# Altium PCB ledcube_v2.PcbDoc (part 1 of 18)
Units mil, origin at the board's own origin, x right, y up, seen from the top; angles counter-clockwise.
Board outline 3130 x 3300 mil, 2 copper layers (Top Layer, Bottom Layer); 188 components, 216 nets, 29515 pads, 250 vias.
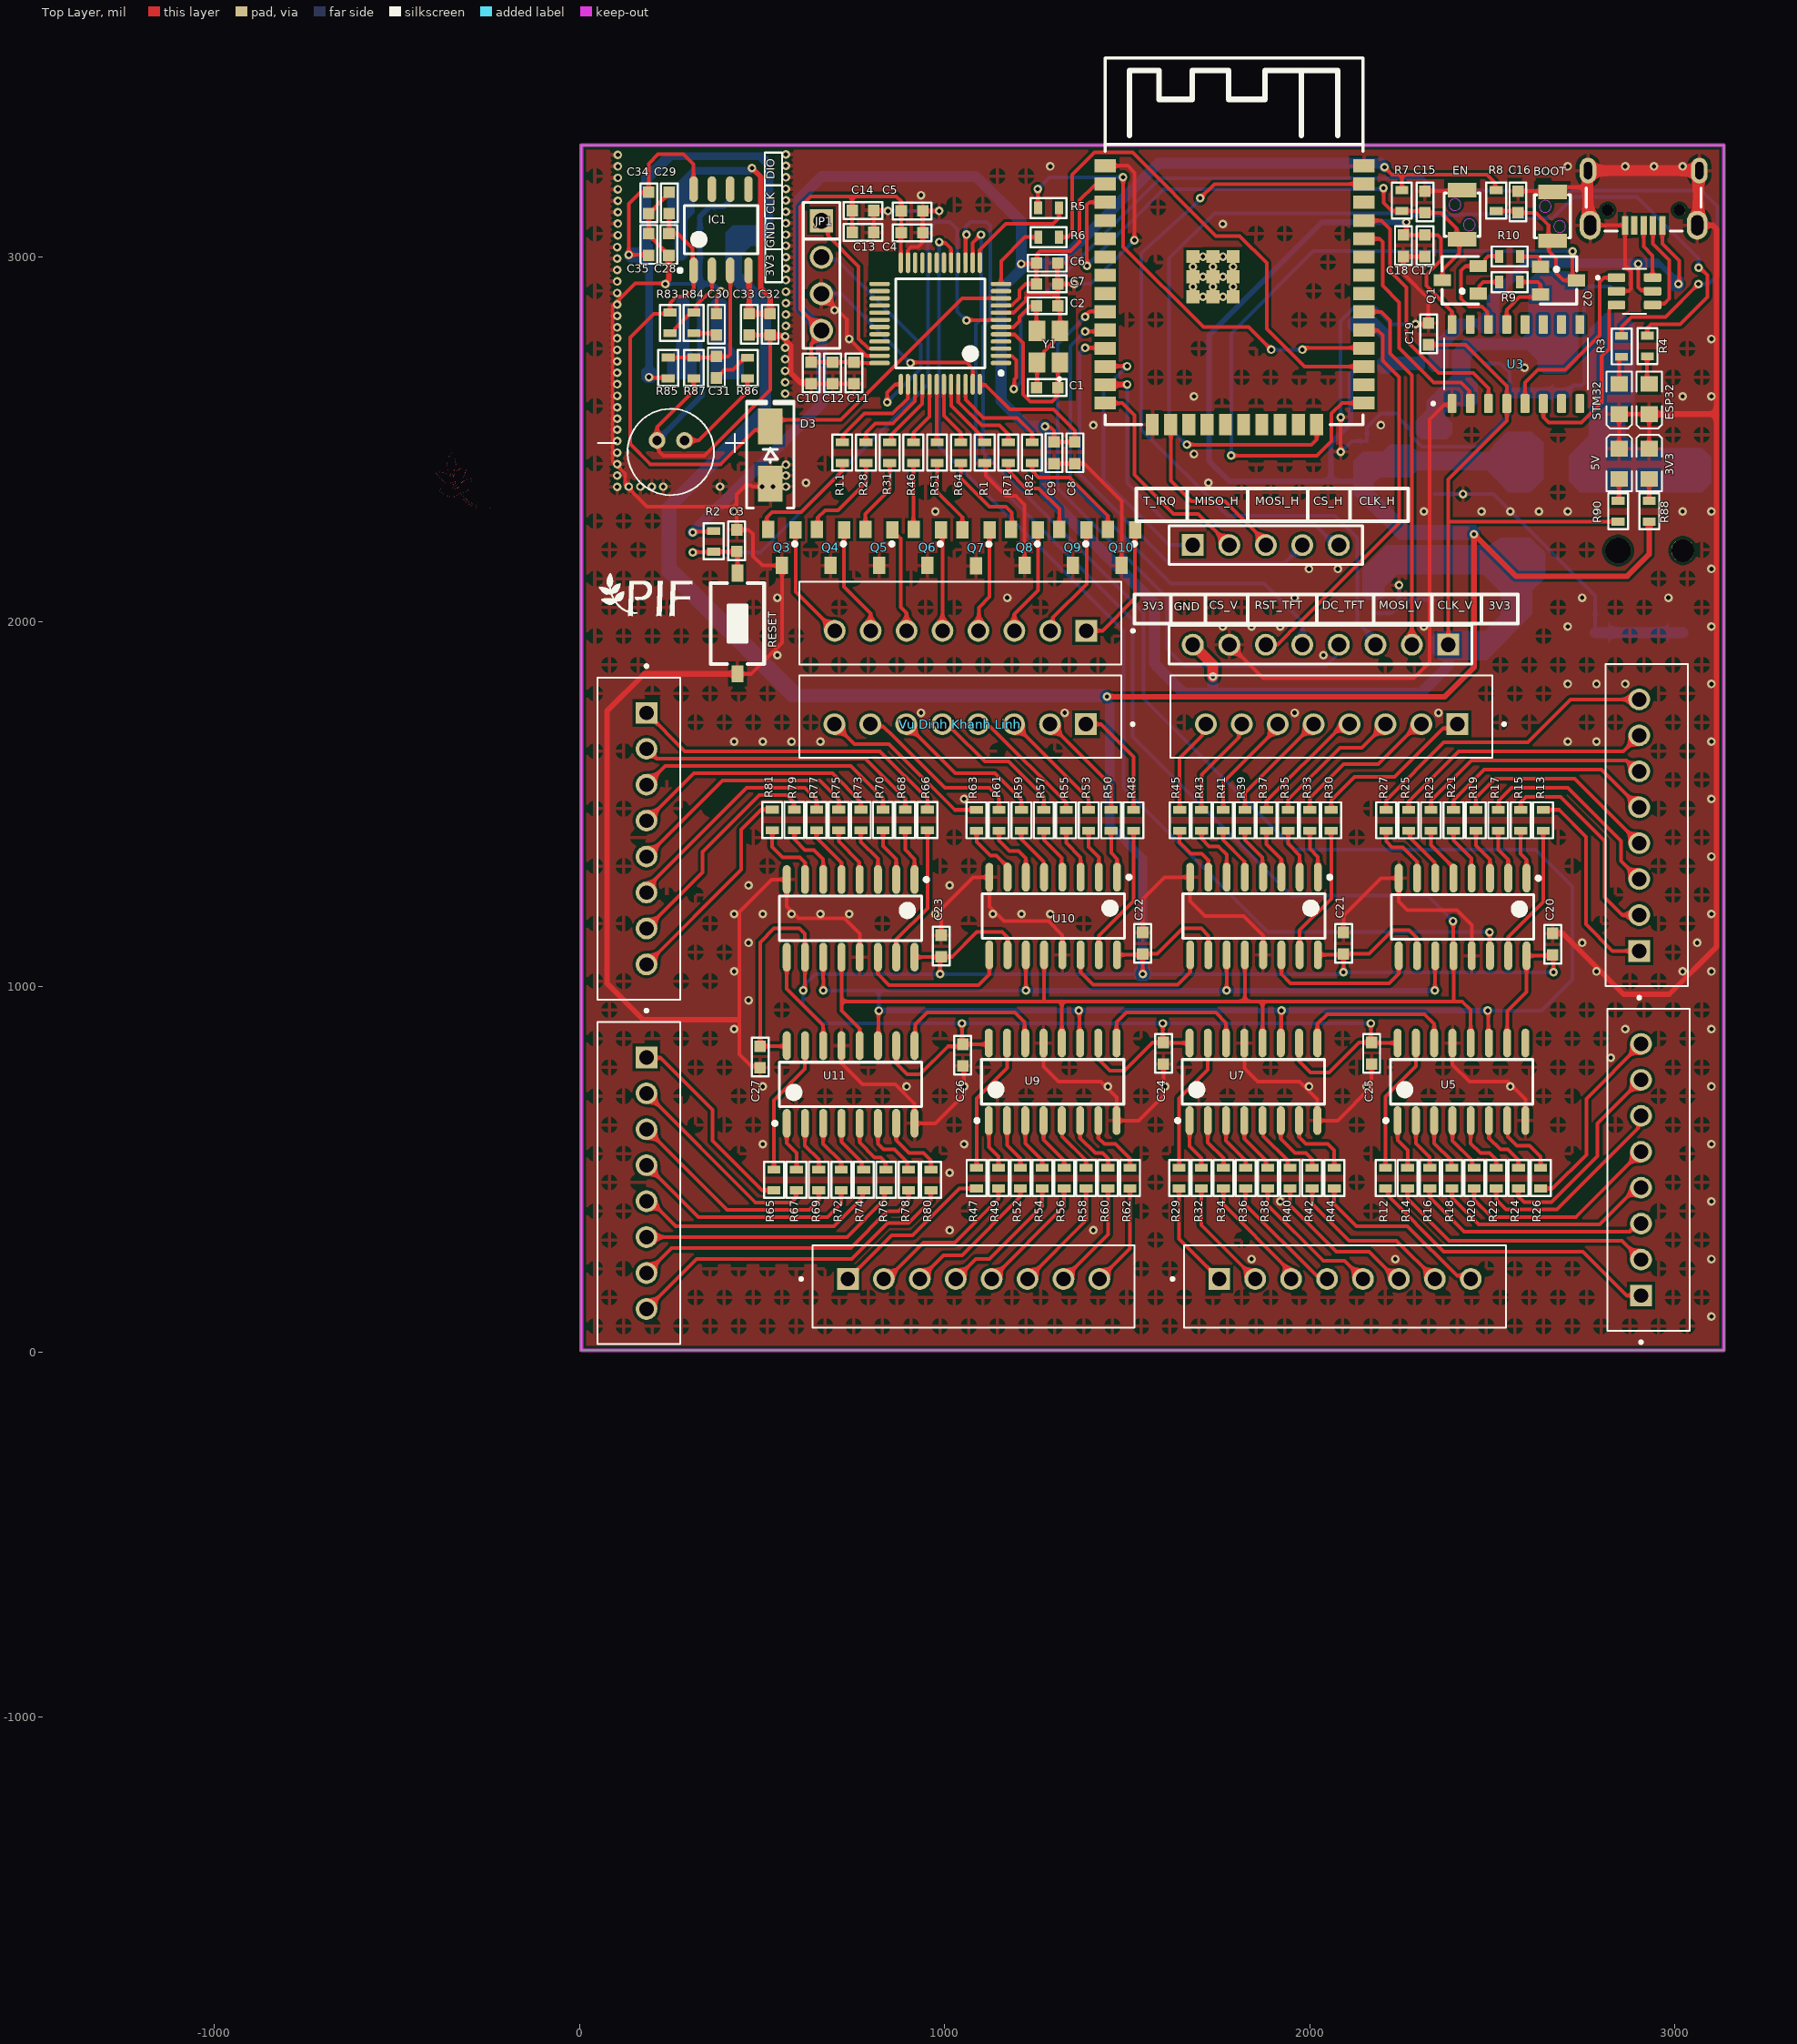
[diagram p0: Top Layer view]
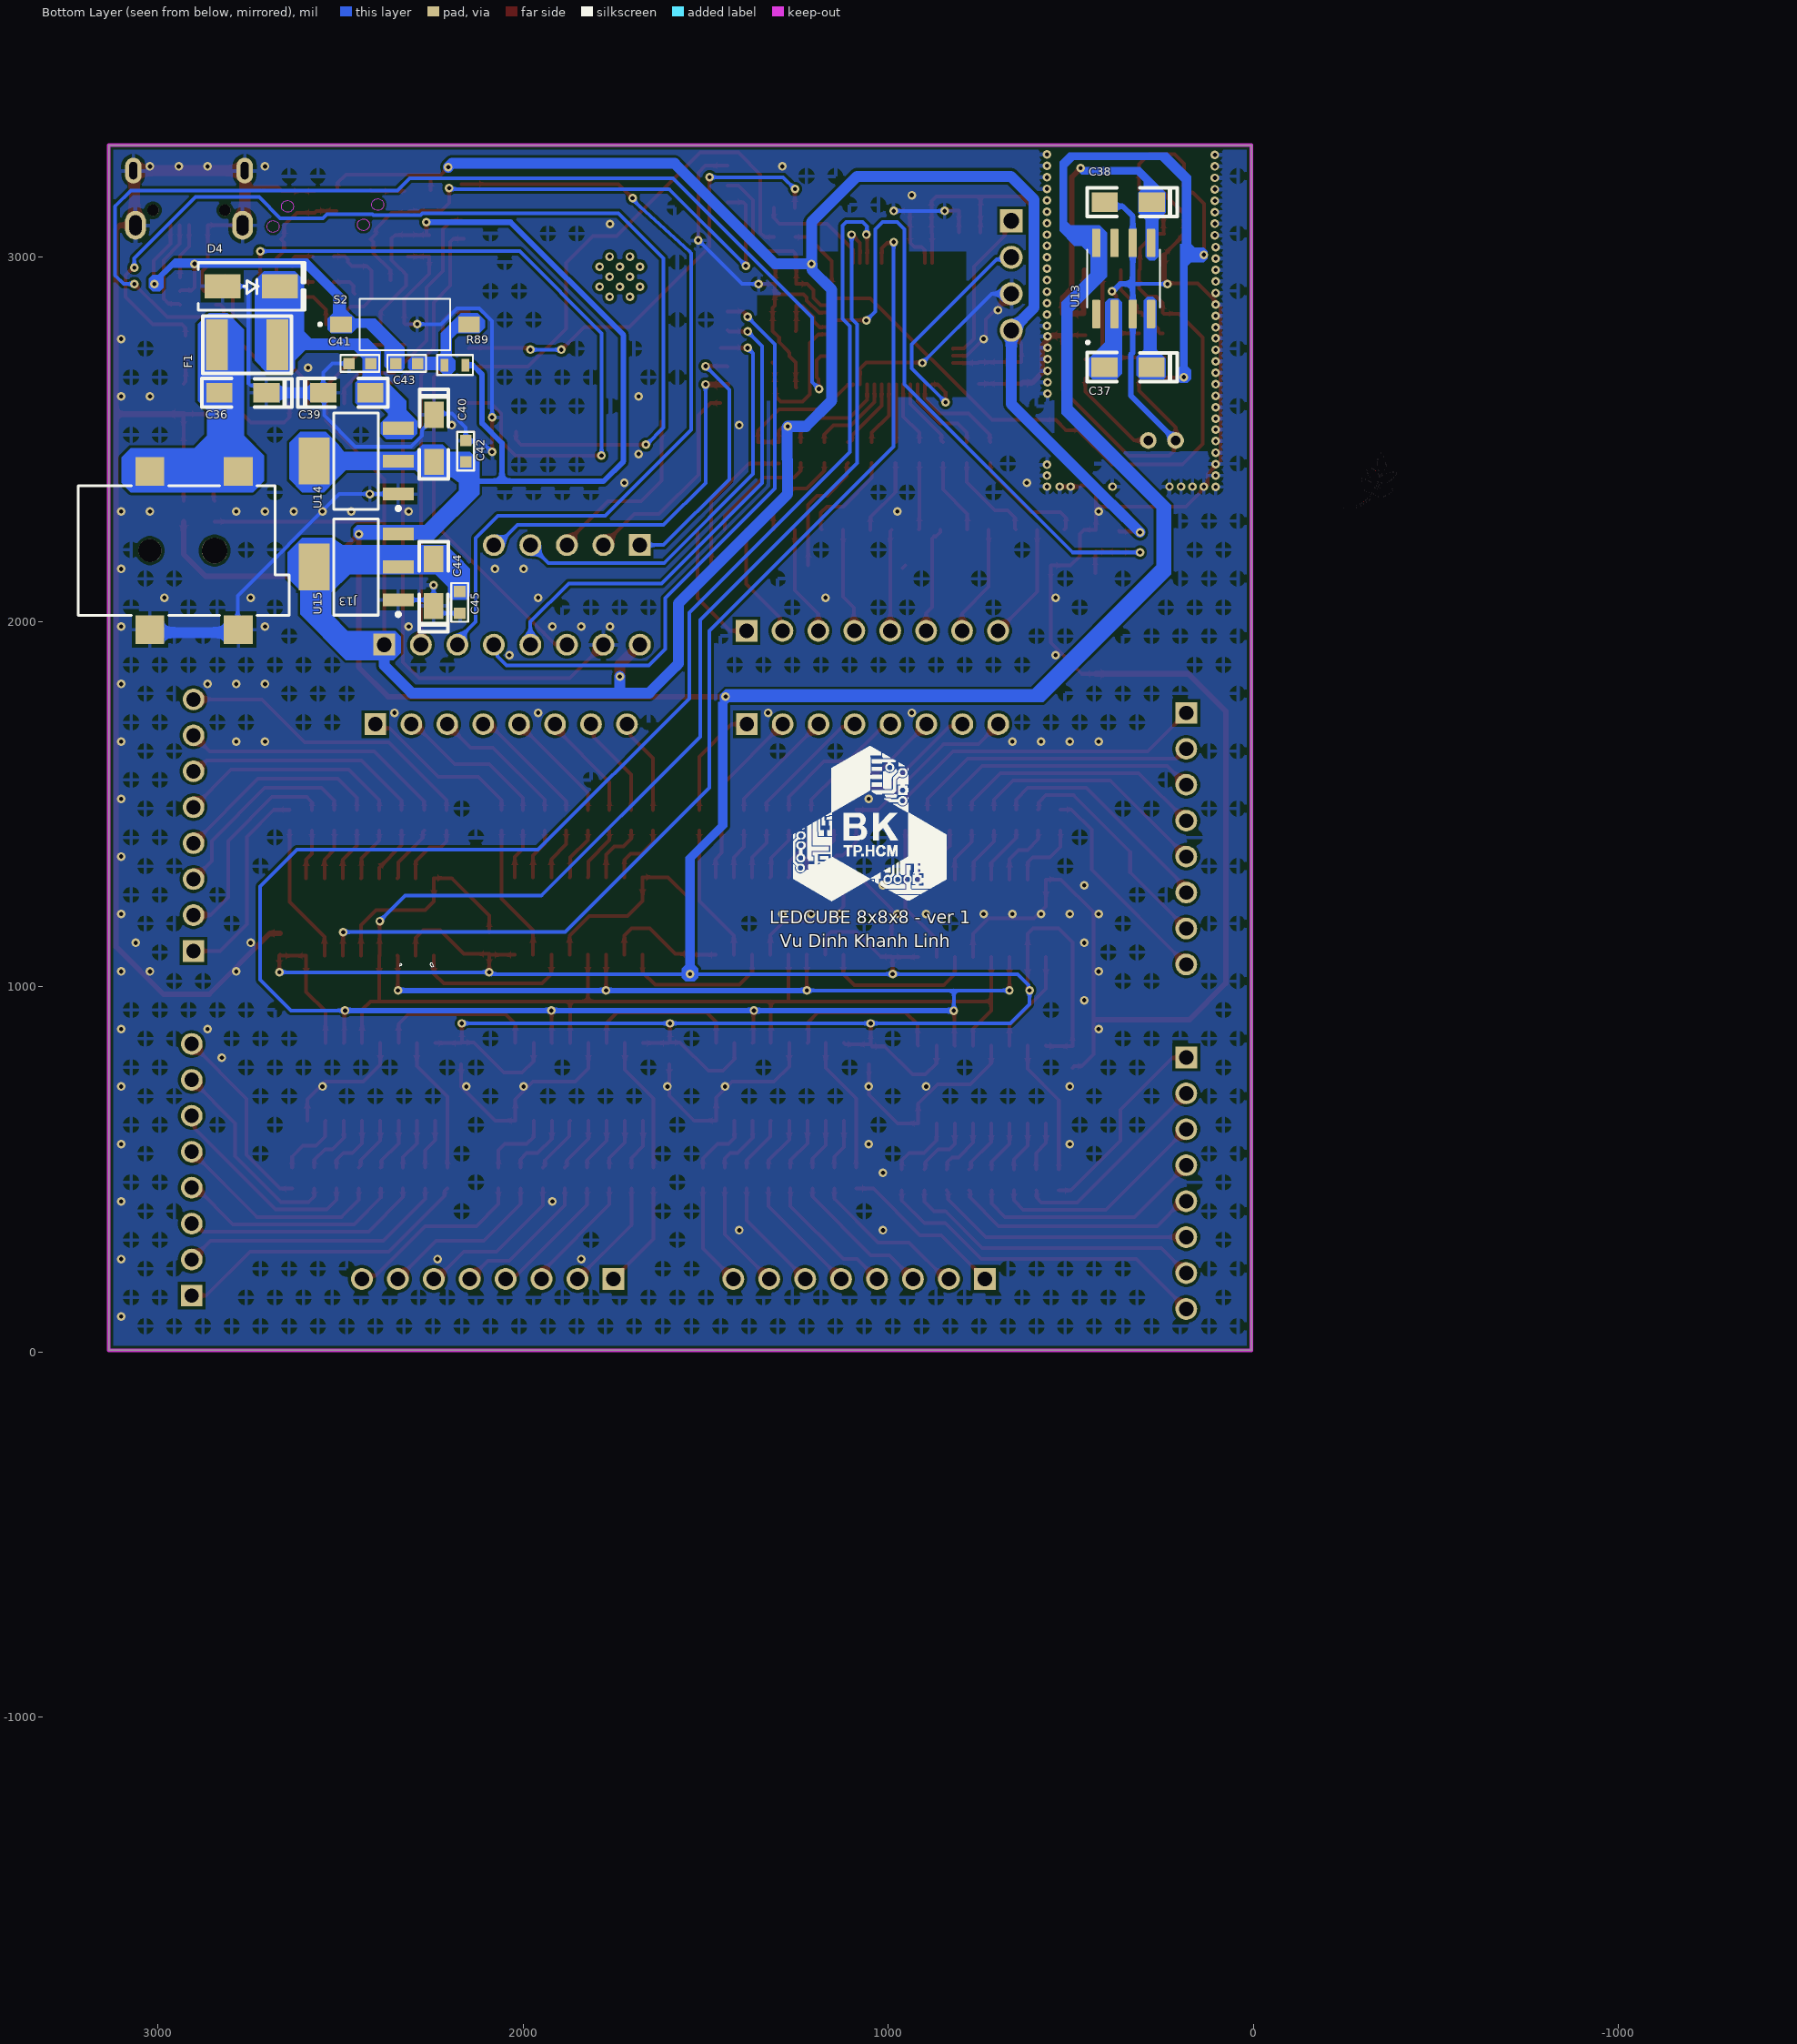
[diagram p1: Bottom Layer view, seen from below]

## Layer stack, top to bottom
Top Solder: solder mask 0.4, Solder Resist, Dk 3.5
Top Layer: signal copper 1.4
Dielectric 1: dielectric 12.6, FR-4, Dk 4.8
Bottom Layer: signal copper 1.4
Bottom Solder: solder mask 0.4, Solder Resist, Dk 3.5

## Board outline
5,5 5,3305 3135,3305 3135,5

## Design rules (kind name [scope] priority, off if disabled: settings)
Clearance [All] p1: gap=7.87 ignorepadtopadclearanceinfootprint=FALSE except(3.94: SMDPad-SMDPad; 13.78: Arc-THPad Track-THPad)
ComponentClearance [All] p1: gap=0 collisioncheckmode=3 verticalgap=0 showdistances=FALSE
MinimumSolderMaskSliver [All] p1: minsoldermaskwidth=3.94
PolygonConnect [All] p1: connectstyle=Relief reliefconductorwidth=10 reliefentries=4 polygonreliefangle="90 Angle" airgapwidth=10
RoutingVias [All] p1: holewidth=11.81 width=23.62 viastyle="Through Hole" minholewidth=11.81 minwidth=23.62 maxholewidth=11.81 maxwidth=23.62
SilkToSilkClearance [All] p1: silktosilkclearance=0
SilkToSolderMaskClearance [IsPad] p1: minsilkscreentomaskgap=0 clearancetoexposedcopper=TRUE
SolderMaskExpansion [All] p1: expansion=4 istentingtop=FALSE
Width [All] p1: maxlimit=30 minlimit=10 preferedwidth=15 minimp=50.000000 maximp=50.000000 favimp=50.000000
26 further rules are at their usual default settings.

## Classes and differential pairs
component class USB: C17 C18 C19 MISO_H MOSI_H Q1 Q2 R9 R10 U3
component class Power: 2 5V C36 C37 C38 C39 C40 C41 C42 C43 C44 C45 D4 F1 J13 R88 R89 R90 S2 U13 U14 U15
component class Output: 3V3 C20 C21 C22 C23 C24 C25 C26 C27 CLK_V CS_V DC_TFT "KHANH LINH" MOSI_V Q3 Q4 Q5 Q6 Q7 Q8 Q9 Q10 R11 R12 R13 R14 R15 R16 R17 R18 R19 R20 R21 R22 R23 R24 R25 R26 R27 R28 R29 R30 R31 R32 R33 R34 R35 R36 R37 R38 R39 R40 R41 R42 R43 R44 R45 R46 R47 R48 R49 R50 R51 R52 R53 R54 R55 R56 R57 R58 R59 R60 R61 R62 R63 R64 R65 R66 R67 R68 R69 R70 R71 R72 R73 R74 R75 R76 R77 R78 R79 R80 R81 R82 RST_TFT U5 U7 U9 U10 U11
component class MCU: C1 C2 C3 C4 C5 C6 C7 C8 C9 C10 C11 C12 DIO JP1 R1 R2 R3 RESET STM32 Y1
component class Input: C28 C29 C30 C31 C32 C33 C34 C35 CLK D3 IC1 R83 R84 R85 R86 R87 T_IRQ
component class ESP32: 2 C13 C14 C15 C16 EN ESP32 R4 R5 R6 R7 R8

## Components (designator, comment, footprint, x,y, rotation, side; value= is the part's Value field where it differs from the comment)
3V3 "B8B-XH-A" JST_B8B-XH-A 162.72,1406.02 r90 top (schematic designator J11)
3V3 "B8B-XH-A" JST_B8B-XH-A 162.72,462.59 r90 top (schematic designator J10)
3V3 "B8B-XH-A" JST_B8B-XH-A 2096.95,179.56 r180 top (schematic designator J6)
3V3 "LED SMD" LED_0805_Blue 2930,2432.49 r90 top (schematic designator D5)
5V "LED SMD" LED_0805_Blue 2847.5,2432.49 r90 top (schematic designator D6)
BOOT "B3U-1000P" SODFL4025X160N 2665,3110 r90 top (schematic designator B2)
C1 "22 pF, 50 VDC" CAP_0603#1 1282.96,2638.2 r0 top
C2 "22 pF, 50 VDC" CAP_0603#1 1279.03,2868.2 r180 top
C3 "100 nF, 50 VDC" CAP_0603#1 427.72,2220.23 r270 top
C4 "100 nF, 50 VDC" CAP_0603#1 908.8,3068.2 r180 top
C5 "1 uF, 16 VDC" CAP_0603#1 908.8,3128.2 r180 top
C6 "100 nF, 50 VDC" CAP_0603#1 1279.03,2985.2 r180 top
C7 "1 uF, 16 VDC" CAP_0603#1 1279.03,2928.2 r180 top
C8 "100 nF, 50 VDC" CAP_0603#1 1359.74,2464.73 r90 top
C9 "1 uF, 16 VDC" CAP_0603#1 1302.74,2464.73 r90 top
C10 "4.7 uF, 10 VDC" CAP_0603#1 637.74,2683.2 r90 top
C11 "100 nF, 50 VDC" CAP_0603#1 754.74,2683.2 r90 top
C12 "1 uF, 16 VDC" CAP_0603#1 696.24,2683.2 r90 top
C13 "100 nF, 50 VDC" CAP_0603#1 774.74,3069.2 r180 top
C14 "10 uF, 10 VDC" CAP_0603#1 774.74,3129.2 r180 top
C15 "100 nF, 50 VDC" CAP_0603#1 2312.72,3147.52 r270 top
C16 "100 nF, 50 VDC" CAP_0603#1 2567.72,3147.52 r270 top
C17 "100 nF, 50 VDC" CAP_0603#1 2318.72,3031.76 r90 top
C18 "10 uF, 10 VDC" CAP_0603#1 2260,3031.76 r90 top
C19 "10 nF, 50 VDC" CAP_0603#1 2328.72,2790 r90 top
C20 "1 uF, 16 VDC" CAP_0603#1 2662.72,1115.23 r270 top
C21 "1 uF, 16 VDC" CAP_0603#1 2089.72,1117.76 r270 top
C22 "1 uF, 16 VDC" CAP_0603#1 1539.72,1117.76 r270 top
C23 "1 uF, 16 VDC" CAP_0603#1 987.72,1110.23 r270 top
C24 "1 uF, 16 VDC" CAP_0603#1 1602.72,820.23 r90 top
C25 "1 uF, 16 VDC" CAP_0603#1 2172.72,820.23 r90 top
C26 "1 uF, 16 VDC" CAP_0603#1 1052.72,815.23 r90 top
C27 "1 uF, 16 VDC" CAP_0603#1 497.72,810.23 r90 top
C28 "10 uF, 16 VDC" CAP_0603#1 247.72,3035.23 r90 top
C29 "100 nF, 50 VDC" CAP_0603#1 242.72,3145.23 r270 top
C30 "100 nF, 50 VDC" CAP_0603#1 377.98,2816.54 r90 top
C31 "1 uF, 16 VDC" CAP_0603#2 377.98,2695.09 r270 top
C32 "100 nF, 50 VDC" CAP_0603#1 525,2816.54 r90 top
C33 "1 uF, 16 VDC" CAP_0603#1 467.98,2816.54 r90 top
C34 "100 nF, 50 VDC" CAP_0603#1 192.72,3149.16 r90 top
C35 "1 uF, 16 VDC" CAP_0603#1 186.72,3031.31 r270 top
C36 "10 µF, 16 V" "TANTALUM SMD A" 2765,2627.73 r180 bottom
C37 "10 µF, 16 V" "TANTALUM SMD A" 340.27,2698.17 r180 bottom
C38 "10 µF, 16 V" "TANTALUM SMD A" 340,3150 r180 bottom
C39 "10 µF, 16 V" "TANTALUM SMD A" 2485,2626.53 r0 bottom
C40 "10 µF, 16 V" "TANTALUM SMD A" 2245.08,2505 r90 bottom
C41 "1 uF, 16 VDC" CAP_0603#1 2445,2704.11 r180 bottom
C42 "1 uF, 16 VDC" CAP_0603#1 2160,2465 r270 bottom
C43 "100 nF, 50 VDC" CAP_0603#1 2316.73,2704.11 r180 bottom
C44 "10 µF, 16 V" "TANTALUM SMD A" 2243.88,2105 r270 bottom
C45 "1 uF, 16 VDC" CAP_0603#1 2170.49,2055 r90 bottom
CLK "POM-2740P-C33-R" MIC_POM-2740P-C33-R 250,2465 r0 top (schematic designator LS1)
CLK_H "B8B-XH-A" JST_B8B-XH-A 2060.08,1740.23 r0 top (schematic designator J7)
CLK_V "B8B-XH-A" JST_B8B-XH-A 2928.38,499.46 r270 top (schematic designator J3)
CS_H "61300811821" 61300811821 2030,1937.3 r180 top (schematic designator J2)
CS_V "74HC595 SMD" "SOP 16" 1847.56,1194.21 r270 top (schematic designator U8)
D3 "SS34" "DIODE SMA" 522.63,2456.26 r90 top
D4 "SS34" "DIODE SMA" 2745,2918.54 r180 bottom
DC_TFT "B8B-XH-A" JST_B8B-XH-A 2923.38,1442.89 r270 top (schematic designator J4)
DIO "STM32F103C8T6" STM32F103C8T6 988.33,2816.87 r180 top (schematic designator U1)
EN "B3U-1000P" SODFL4025X160N 2417.72,3114.83 r90 top (schematic designator B1)
ESP32 "LED SMD" LED_0805_Blue 2930,2610 r270 top (schematic designator D2)
F1 "16V, 2.5A" Fuse_SMD_1812 2755,2758.54 r180 bottom
GND "B8B-XH-A" JST_B8B-XH-A 1079.59,179.56 r180 top (schematic designator J8)
GND "ESP32-WROOM-32E" ESP32-WROOM 1439.84,2539.76 r0 top (schematic designator U2)
IC1 "LM358 SOP8" "SOP 8" 387.72,3073.47 r90 top
J5 "B8B-XH-A" JST_B8B-XH-A 1043.5,1995.9 r0 top
J13 "DC050" DC050 2895,2195 r0 bottom
JP1 "JP 1x4 2.54" "JP 1x4 DT" 662.68,3098.2 r270 top
MISO_H "Micro USB 2.0 Type B" 629105150521 2915,3200 r180 top (schematic designator J1)
MOSI_H "USBLC6-2SC6" SOT95P280X145-6N 2890,2905 r0 top (schematic designator U4)
MOSI_V "74HC595 SMD" "SOP 16" 2419.05,1191.61 r270 top (schematic designator U6)
Q1 "BC817" SOT-23 2412.72,2935.23 r90 top value=C9014
Q2 "BC817" SOT-23 2681.26,2935.23 r270 top value=C9014
Q3 "C1815" SOT23B 554.74,2203.2 r0 top
Q4 "C1815" SOT23B 687.6,2203.2 r0 top
Q5 "C1815" SOT23B 820.46,2203.2 r0 top
Q6 "C1815" SOT23B 953.31,2203.2 r0 top
Q7 "C1815" SOT23B 1086.17,2202.42 r0 top
Q8 "C1815" SOT23B 1219.03,2203.2 r0 top
Q9 "C1815" SOT23B 1351.89,2203.2 r0 top
Q10 "C1815" SOT23B 1484.74,2203.2 r0 top
R1 "10 KOhm, 1/4 W" resistor_0603 1109.74,2463.2 r90 top
R2 "10 KOhm, 1/4 W" resistor_0603 367.72,2220.23 r90 top
R3 "510 Ohm, 1/4 W" resistor_0603 2854.44,2754.08 r270 top
R4 "510 Ohm, 1/4 W" resistor_0603 2925,2755 r270 top
R5 "0 Ohm, 1/4 W" resistor_0603 1284.74,3133.2 r180 top
R6 "0 Ohm, 1/4 W" resistor_0603 1284.96,3053.2 r0 top
R7 "10 KOhm, 1/4 W" resistor_0603 2252.72,3153.44 r90 top
R8 "10 KOhm, 1/4 W" resistor_0603 2511.07,3153.44 r90 top
R9 "10 KOhm, 1/4 W" resistor_0603 2547.5,2930.23 r180 top
R10 "10 KOhm, 1/4 W" resistor_0603 2547.72,3000 r0 top
R11 "1.2 KOhm, 1/4 W" resistor_0603 719.74,2463.2 r90 top
R12 "680 Ohm, 1/4 W" resistor_0603 2207.56,476.46 r270 top
R13 "680 Ohm, 1/4 W" resistor_0603 2639.7,1456.46 r90 top
R14 "680 Ohm, 1/4 W" resistor_0603 2268.27,476.46 r270 top
R15 "680 Ohm, 1/4 W" resistor_0603 2578.27,1456.46 r90 top
R16 "680 Ohm, 1/4 W" resistor_0603 2328.99,476.46 r270 top
R17 "680 Ohm, 1/4 W" resistor_0603 2516.84,1456.46 r90 top
R18 "680 Ohm, 1/4 W" resistor_0603 2389.7,476.46 r270 top
R19 "680 Ohm, 1/4 W" resistor_0603 2455.41,1456.46 r90 top
R20 "680 Ohm, 1/4 W" resistor_0603 2450.41,476.46 r270 top
R21 "680 Ohm, 1/4 W" resistor_0603 2393.99,1456.46 r90 top
R22 "680 Ohm, 1/4 W" resistor_0603 2511.13,476.46 r270 top
R23 "680 Ohm, 1/4 W" resistor_0603 2332.56,1456.46 r90 top
R24 "680 Ohm, 1/4 W" resistor_0603 2571.84,476.46 r270 top
R25 "680 Ohm, 1/4 W" resistor_0603 2271.13,1456.46 r90 top
R26 "680 Ohm, 1/4 W" resistor_0603 2632.56,476.46 r270 top
R27 "680 Ohm, 1/4 W" resistor_0603 2209.7,1456.46 r90 top
R28 "1.2 KOhm, 1/4 W" resistor_0603 784.74,2463.2 r90 top
R29 "680 Ohm, 1/4 W" resistor_0603 1642.56,476.46 r270 top
R30 "680 Ohm, 1/4 W" resistor_0603 2058.99,1456.46 r90 top
R31 "1.2 KOhm, 1/4 W" resistor_0603 849.74,2463.2 r90 top
R32 "680 Ohm, 1/4 W" resistor_0603 1703.27,476.46 r270 top
R33 "680 Ohm, 1/4 W" resistor_0603 2000.41,1456.46 r90 top
R34 "680 Ohm, 1/4 W" resistor_0603 1763.99,476.46 r270 top
R35 "680 Ohm, 1/4 W" resistor_0603 1941.13,1456.46 r90 top
R36 "680 Ohm, 1/4 W" resistor_0603 1824.7,476.46 r270 top
R37 "680 Ohm, 1/4 W" resistor_0603 1881.84,1456.46 r90 top
R38 "680 Ohm, 1/4 W" resistor_0603 1885.41,476.46 r270 top
R39 "680 Ohm, 1/4 W" resistor_0603 1822.56,1456.46 r90 top
R40 "680 Ohm, 1/4 W" resistor_0603 1946.13,476.46 r270 top
R41 "680 Ohm, 1/4 W" resistor_0603 1763.27,1456.46 r90 top
R42 "680 Ohm, 1/4 W" resistor_0603 2006.84,476.46 r270 top
R43 "680 Ohm, 1/4 W" resistor_0603 1703.99,1456.46 r90 top
R44 "680 Ohm, 1/4 W" resistor_0603 2067.56,476.46 r270 top
R45 "680 Ohm, 1/4 W" resistor_0603 1643.99,1456.46 r90 top
R46 "1.2 KOhm, 1/4 W" resistor_0603 914.74,2463.2 r90 top
R47 "680 Ohm, 1/4 W" resistor_0603 1087.56,476.46 r270 top
R48 "680 Ohm, 1/4 W" resistor_0603 1517.56,1456.46 r90 top
R49 "680 Ohm, 1/4 W" resistor_0603 1147.56,476.46 r270 top
R50 "680 Ohm, 1/4 W" resistor_0603 1456.13,1456.46 r90 top
R51 "1.2 KOhm, 1/4 W" resistor_0603 979.74,2463.2 r90 top
R52 "680 Ohm, 1/4 W" resistor_0603 1207.56,476.46 r270 top
R53 "680 Ohm, 1/4 W" resistor_0603 1394.7,1456.46 r90 top
R54 "680 Ohm, 1/4 W" resistor_0603 1267.56,476.46 r270 top
R55 "680 Ohm, 1/4 W" resistor_0603 1333.27,1456.46 r90 top
R56 "680 Ohm, 1/4 W" resistor_0603 1327.56,476.46 r270 top
R57 "680 Ohm, 1/4 W" resistor_0603 1271.84,1456.46 r90 top
R58 "680 Ohm, 1/4 W" resistor_0603 1387.56,476.46 r270 top
R59 "680 Ohm, 1/4 W" resistor_0603 1210.41,1456.46 r90 top
R60 "680 Ohm, 1/4 W" resistor_0603 1447.56,476.46 r270 top
R61 "680 Ohm, 1/4 W" resistor_0603 1148.99,1456.46 r90 top
R62 "680 Ohm, 1/4 W" resistor_0603 1507.56,476.46 r270 top
R63 "680 Ohm, 1/4 W" resistor_0603 1087.56,1456.46 r90 top
R64 "1.2 KOhm, 1/4 W" resistor_0603 1044.74,2463.2 r90 top
R65 "680 Ohm, 1/4 W" resistor_0603 532.56,471.46 r270 top
R66 "680 Ohm, 1/4 W" resistor_0603 952.93,1457.3 r90 top
R67 "680 Ohm, 1/4 W" resistor_0603 593.99,471.46 r270 top
R68 "680 Ohm, 1/4 W" resistor_0603 892.22,1457.3 r90 top
R69 "680 Ohm, 1/4 W" resistor_0603 655.42,471.46 r270 top
R70 "680 Ohm, 1/4 W" resistor_0603 831.5,1457.3 r90 top
R71 "1.2 KOhm, 1/4 W" resistor_0603 1174.74,2463.2 r90 top
R72 "680 Ohm, 1/4 W" resistor_0603 716.84,471.46 r270 top
R73 "680 Ohm, 1/4 W" resistor_0603 770.79,1457.3 r90 top
R74 "680 Ohm, 1/4 W" resistor_0603 778.27,471.46 r270 top
R75 "680 Ohm, 1/4 W" resistor_0603 710.07,1457.3 r90 top
R76 "680 Ohm, 1/4 W" resistor_0603 839.7,471.46 r270 top
R77 "680 Ohm, 1/4 W" resistor_0603 649.36,1457.3 r90 top
R78 "680 Ohm, 1/4 W" resistor_0603 901.13,471.46 r270 top
R79 "680 Ohm, 1/4 W" resistor_0603 588.65,1457.3 r90 top
R80 "680 Ohm, 1/4 W" resistor_0603 962.56,471.46 r270 top
R81 "680 Ohm, 1/4 W" resistor_0603 527.93,1457.3 r90 top
R82 "1.2 KOhm, 1/4 W" resistor_0603 1239.74,2463.2 r90 top
R83 "100 KOhm, 1/4 W" resistor_0603 247.98,2818.54 r90 top
R84 "1 KOhm, 1/4 W" resistor_0603 312.98,2818.54 r90 top
R85 "10 KOhm, 1/4 W" resistor_0603 242.98,2695.09 r270 top
R86 "2.2  KOhm, 1/4 W" resistor_0603 460.27,2694.86 r90 top
R87 "10 KOhm, 1/4 W" resistor_0603 312.98,2695.09 r90 top
R88 "300 Ohm, 1/4 W" resistor_0603 2930,2302.77 r270 top
R89 "10 KOhm, 1/4 W" resistor_0603 2186.46,2702.55 r180 bottom
R90 "120 Ohm, 1/4 W" resistor_0603 2845,2302.77 r270 top
RESET "Tact SW - 2Pin" SW-SMD 432.72,1995.23 r90 top (schematic designator S1)
RST_TFT "74HC595 SMD" "SOP 16" 742.56,1187.91 r270 top (schematic designator U12)
S2 "KAE01SGGT" SW_KAE01SGGT 2323.42,2814.42 r180 bottom
STM32 "LED SMD" LED_0805_Blue 2847.5,2610 r270 top (schematic designator D1)
T_IRQ "61300511821" 61300511821 1880,2210 r0 top (schematic designator J12)
U3 "CH340C" SOIC127P600X180-16N 2565,2705.94 r90 top
U5 "74HC595 SMD" "SOP 16" 2416.06,740.31 r90 top
U7 "74HC595 SMD" "SOP 16" 1846.06,740.31 r90 top
U9 "74HC595 SMD" "SOP 16" 1296.06,740.31 r90 top
U10 "74HC595 SMD" "SOP 16" 1297.56,1194.21 r270 top
U11 "74HC595 SMD" "SOP 16" 742.56,732.91 r90 top
U13 "ICL7662EBA+" SOIC127P600X175-8N 355,2940 r90 bottom
U14 "5V, 1A" "AMS1117-5V SOT223" 2457.19,2440 r0 bottom
U15 "3.3V, 1A" "AMS1117-3.3V SOT223" 2457.19,2150 r0 bottom
"Vu Dinh Khanh Linh" "B8B-XH-A" JST_B8B-XH-A 1042.72,1740.23 r0 top (schematic designator J9)
Y1 "8MHz" WE-XTAL_CFPX-180 1284.74,2753.2 r90 top

## Footprints (in the part's own frame and the unit in brackets; to place one, negate y for a bottom-side part, rotate by r counter-clockwise, add the part's x,y. Pads: shape width x height; smd on the part's side, far side on the other; paste and mask are expansions set on the pad)
61300511821 [mm] "Socket Header, Pitch 2.54 mm, THT, Vertical, single row, 5p"
  rect 1.52x1.52 hole 1.02: 1(-5.08,0)
  round 1.52 hole 1.02: 2(-2.54,0) 3(0,0) 4(2.54,0) 5(5.08,0)
  silkscreen extent -6.73,-1.35 6.73,1.35, body extent -6.6,-1.25 6.6,1.25, height 8.55
61300811821 [mm] "Socket Header, Pitch 2.54 mm, THT, Vertical, single row, 8p"
  rect 1.52x1.52 hole 1.02: 1(-8.89,0)
  round 1.52 hole 1.02: 2(-6.35,0) 3(-3.81,0) 4(-1.27,0) 5(1.27,0) 6(3.81,0) 7(6.35,0) 8(8.89,0)
  silkscreen extent -10.54,-1.35 10.54,1.35, body extent -10.41,-1.25 10.41,1.25, height 8.55
629105150521 [mm] "Micro USB 2.0 SMT Type B Horizontal 5 Contacts High Current"
  rect 0.45x1.3 smd: 1(-1.3,2.9) 2(-0.65,2.9) 3(0,2.9) 4(0.65,2.9) 5(1.3,2.9)
  round 0.8 hole 0.8 unplated: MH1(-2.5,1.85) MH2(2.5,1.85)
  oval 1.15x1.8 hole 0.55 slot 1.2 at 90 deg: Shell(-3.875,-0.9) Shell(3.875,-0.9)
  oval 1.45x2 hole 0.85 slot 1.4 at 90 deg: Shell(-3.725,2.9) Shell(3.725,2.9)
  silkscreen extent -4,0.3 4,3.3, body extent -4,-3.3 4,3.3, height 2.75
"AMS1117-3.3V SOT223" [mm] "SOT223, 4-Leads, Body 6.51x7.00mm, Pitch 2.29mm"
  rect 2.15x0.9 smd: 1(-2.93,2.29) 2(-2.93,0) 3(-2.93,-2.29)
  rect 2.15x3.25 smd: 4(2.93,0)
  silkscreen extent -3.05,-3.35 1.55,3.41, body extent -3.5,-3.35 3.5,3.35, height 1.8
"AMS1117-5V SOT223" [mm] "SOT223, 4-Leads, Body 6.51x7.00mm, Pitch 2.29mm"
  rect 2.15x0.9 smd: 1(-2.93,2.29) 2(-2.93,0) 3(-2.93,-2.29)
  rect 2.15x3.25 smd: 4(2.93,0)
  silkscreen extent -3.05,-3.35 1.55,3.41, body extent -3.5,-3.35 3.5,3.35, height 1.8
CAP_0603#1 [mm]
  rect 0.8x0.8 smd: 1(-0.801,0.076) 2(0.699,0.076)
  silkscreen extent -1.4,-0.51 1.3,0.66, body extent -0.85,-0.32 0.75,0.48, height 0.8
CAP_0603#2 [mm]
  rect 0.8x0.8 smd: 1(-0.801,-0.076) 2(0.699,-0.076)
  silkscreen extent -1.4,-0.66 1.3,0.51, body extent -0.85,-0.48 0.75,0.32, height 0.8
DC050 [mm]
  rect 2x2 smd: 1(-2.92,-5.5) 1(3.23,-5.5) 2(3.23,5.5) 3(-2.92,5.5)
  round 1.6 hole 1.6 unplated: MH1(3.23,0)
  round 1.8 hole 1.8 unplated: MH2(-1.27,0)
  silkscreen extent -6.47,-4.5 8.23,4.5, body extent -6.47,-6.25 8.23,6.25, height 11.05
"DIODE SMA" [mm] "SMA"
  rect 2.5x1.7 smd: 1(-2,0) 2(2,0)
  silkscreen extent -3.68,-1.65 3.75,1.65, body extent -2.6,-1.37 2.6,1.37, height 2.4
ESP32-WROOM [mm]
  rect 1.5x0.9 smd mask+0.102: 1(0,18.01) 2(0,16.74) 3(0,15.47) 4(0,14.2) 5(0,12.93) 6(0,11.66) 7(0,10.39) 8(0,9.12) 9(0,7.85) 10(0,6.58) 11(0,5.31) 12(0,4.04) 13(0,2.77) 14(0,1.5) 25(18,1.5) 26(18,2.77) 27(18,4.04) 28(18,5.31) 29(18,6.58) 30(18,7.85) 31(18,9.12) 32(18,10.39) 33(18,11.66) 34(18,12.93) 35(18,14.2) 36(18,15.47) 37(18,16.74) 38(18,18.01)
  rect 0.9x1.5 smd mask+0.102: 15(3.28,0) 16(4.55,0) 17(5.82,0) 18(7.09,0) 19(8.36,0) 20(9.63,0) 21(10.9,0) 22(12.17,0) 23(13.44,0) 24(14.71,0)
  rect 0.9x0.9 smd mask+0.102: 39(6.1,8.89) 39(6.1,10.29) 39(6.1,11.69) 39(7.5,8.89) 39(7.5,10.29) 39(7.5,11.69) 39(8.9,8.89) 39(8.9,10.29) 39(8.9,11.69)
  silkscreen extent 0,0 17.94,25.5, body extent -0.07,0 18,25.54, height 3.04
Fuse_SMD_1812 [mil] "Fuse SMD, size 1812"
  rect 60x140 smd: 0(-83.41,0) 1(82,0)
  silkscreen extent -122,-78 121,79, body extent -93,-67 93,67, height 18
"JP 1x4 DT" [mm] "4 pins, 1 row, straight, gold plating"
  rect 1.6x1.6 hole 1.1: 1(0,0)
  round 1.6 hole 1.1: 2(2.54,0) 3(5.08,0) 4(7.62,0)
  silkscreen extent -1.27,-1.27 8.89,1.27, body extent -1.27,-1.27 8.89,1.27, height 8.54
JST_B8B-XH-A [mm]
  rect 1.508x1.508 / inner round 1.508 / far side rect 1.508x1.508 hole 1: 1(8.75,-0.525)
  round 1.508 hole 1: 2(6.25,-0.525) 3(3.75,-0.525) 4(1.25,-0.525) 5(-1.25,-0.525) 6(-3.75,-0.525) 7(-6.25,-0.525) 8(-8.75,-0.525)
  silkscreen extent -11.2,-2.88 12.1,2.88, body extent -11.2,-2.88 11.2,2.88, height 7
LED_0805_Blue [mm] "Chip LED, 2-Leads, Body 2.0x1.3mm, IPC Medium Density"
  rect 1.1x1.2 smd: 1(-1.05,0) 2(1.05,0)
  silkscreen extent -1.91,-0.89 2.03,0.89, body extent -1,-0.63 1,0.62, height 0.68
MIC_POM-2740P-C33-R [mm]
  round 1.158 hole 0.65: N(-0.95,0.8) P(0.95,0.8)
  silkscreen extent -5.08,-3 5.08,3, body extent -3,-3.04 3,2.96, height 1.19
resistor_0603 [mm]
  rect 0.55x0.9 smd: 1(-0.725,0) 2(0.725,0)
  silkscreen extent -1.25,-0.69 1.24,0.7, body extent -0.8,-0.45 0.8,0.45, height 0.5
SODFL4025X160N [mm]
  rect 1x2 smd paste-0.1: IN(-1.7,0) OUT(1.7,0)
  Keep-Out Layer circle w0: c-0.7,-0.5 r0.412
  Keep-Out Layer circle w0: c0.7,0.5 r0.412
  silkscreen extent -1.5,-1.25 1.5,1.25
SOIC127P600X175-8N [mm]
  rrect25% 1.97x0.59 smd: 1(-2.475,1.905) 2(-2.475,0.635) 3(-2.475,-0.635) 4(-2.475,-1.905) 5(2.475,-1.905) 6(2.475,-0.635) 7(2.475,0.635) 8(2.475,1.905)
  silkscreen extent -4.54,-2.52 2,2.59, body extent -3,-2.45 3,2.45, height 1.75
SOIC127P600X180-16N [mm]
  rrect25% 1.31x0.62 smd: 1(-2.75,4.445) 2(-2.75,3.175) 3(-2.75,1.905) 4(-2.75,0.635) 5(-2.75,-0.635) 6(-2.75,-1.905) 7(-2.75,-3.175) 8(-2.75,-4.445) 9(2.75,-4.445) 10(2.75,-3.175) 11(2.75,-1.905) 12(2.75,-0.635) 13(2.75,0.635) 14(2.75,1.905) 15(2.75,3.175) 16(2.75,4.445)
  silkscreen extent -2.85,-5 1.78,5.85, body extent -3,-5 3,5, height 1.8
"SOP 8" [mm] "SOIC, 8-Leads, Body 4.9x3.9mm, Pitch 1.27mm, IPC High Density"
  oval 1.8x0.6 smd: 1(-2.825,1.905) 2(-2.825,0.635) 3(-2.825,-0.635) 4(-2.825,-1.905) 5(2.825,-1.905) 6(2.825,-0.635) 7(2.825,0.635) 8(2.825,1.905)
  silkscreen extent -2.95,-2.55 1.68,2.98, body extent -2.99,-2.45 3,2.45, height 1.6
"SOP 16" [mm] "SOIC, 16-Leads, Body 9.90x3.91mm, Pitch 1.27mm, IPC Medium Density"
  oval 2x0.55 smd: 1(-2.7,4.445) 2(-2.7,3.175) 3(-2.7,1.905) 4(-2.7,0.635) 5(-2.7,-0.635) 6(-2.7,-1.905) 7(-2.7,-3.175) 8(-2.7,-4.445) 9(2.7,-4.445) 10(2.7,-3.175) 11(2.7,-1.905) 12(2.7,-0.635) 13(2.7,0.635) 14(2.7,1.905) 15(2.7,3.175) 16(2.7,4.445)
  silkscreen extent -2.82,-4.95 1.55,5.4, body extent -3,-4.95 3,4.95, height 1.4
SOT23B [mm] "SOT 23B"
  rect 0.85x1.2 smd: 1(0.94,1.245) 2(0,-1.25) 3(-0.95,1.25)
  silkscreen extent 0.77,0.13 1.02,0.38, body extent -1.5,-1.2 1.5,1.3, height 1.06
SOT95P280X145-6N [mm]
  rrect25% 1.21x0.59 smd: 1(-1.255,0.95) 2(-1.255,0) 3(-1.255,-0.95) 4(1.255,-0.95) 5(1.255,0) 6(1.255,0.95)
  silkscreen extent -2.65,-1.57 0.81,1.57, body extent -1.4,-1.46 1.4,1.46, height 0.4
SOT-23 [mm] "SOT 23 _ 1-3-2"
  rect 0.85x1.2 smd: 1(-0.94,-1.245) 2(0.985,-1.25) 3(0.005,1.25)
  silkscreen extent -1.65,-1.27 1.65,1.27, body extent -1.47,-1.33 1.53,1.17, height 1.06
STM32F103C8T6 [mm] "TSQFP, 48-Leads, Body 7.00x7.00mm, Pitch 0.50mm, IPC Medium Density"
  oval 1.45x0.3 smd: 1(-4.225,2.75) 2(-4.225,2.25) 3(-4.225,1.75) 4(-4.225,1.25) 5(-4.225,0.75) 6(-4.225,0.25) 7(-4.225,-0.25) 8(-4.225,-0.75) 9(-4.225,-1.25) 10(-4.225,-1.75) 11(-4.225,-2.25) 12(-4.225,-2.75) 25(4.225,-2.75) 26(4.225,-2.25) 27(4.225,-1.75) 28(4.225,-1.25) 29(4.225,-0.75) 30(4.225,-0.25) 31(4.225,0.25) 32(4.225,0.75) 33(4.225,1.25) 34(4.225,1.75) 35(4.225,2.25) 36(4.225,2.75)
  oval 0.3x1.45 smd: 13(-2.75,-4.225) 14(-2.25,-4.225) 15(-1.75,-4.225) 16(-1.25,-4.225) 17(-0.75,-4.225) 18(-0.25,-4.225) 19(0.25,-4.225) 20(0.75,-4.225) 21(1.25,-4.225) 22(1.75,-4.225) 23(2.25,-4.225) 24(2.75,-4.225) 37(2.75,4.225) 38(2.25,4.225) 39(1.75,4.225) 40(1.25,4.225) 41(0.75,4.225) 42(0.25,4.225) 43(-0.25,4.225) 44(-0.75,4.225) 45(-1.25,4.225) 46(-1.75,4.225) 47(-2.25,4.225) 48(-2.75,4.225)
  silkscreen extent -4.35,-3.1 3.1,3.57, body extent -4.5,-4.5 4.5,4.5, height 1.6
SW-SMD [mm] "Switch SMD type"
  rect 1.2x0.8 smd: 1(-3.5,0) 2(3.5,0)
  silkscreen extent -2.82,-1.85 2.82,1.85, body extent -3.05,-1.85 3.05,1.85, height 2.5
SW_KAE01SGGT [mm]
  rect 1.5x1.1 smd: 1(-4.45,0) 2(4.45,0)
  silkscreen extent -6.01,-1.79 3.15,1.79, body extent -4.9,-1.79 4.9,1.79, height 3.13
"TANTALUM SMD A" [mil] "SMD TIPO A 3.2x1.6x1.6"
  rect 71.5x53.5 smd: 1(62,-1) 2(-67,-1)
  silkscreen extent -114,-40 132,39, body extent -63,-31 63,31, height 63
WE-XTAL_CFPX-180 [mm] "Quartz Crystal, size CFPX-180, body 3.4x2.7mm"
  rect 1.4x1.15 smd: 1(-1.1,-0.8) 2(1.1,-0.8) 3(1.1,0.8) 4(-1.1,0.8)
  silkscreen extent -2.35,-0.85 -2.15,-0.65, body extent -1.7,-1.35 1.7,1.35, height 0.65

## Part data
3V3 3V3 3V3 CLK_H CLK_V DC_TFT GND J5 "Vu Dinh Khanh Linh": "Connector Header Through Hole 8 position 0.098 (2.50mm)", Package=None, Check_prices=https://www.snapeda.com/parts/B8B-XH-A/JST/view-part/?ref=eda, MF=JST, MP=B8B-XH-A, SnapEDA_Link=https://www.snapeda.com/parts/B8B-XH-A/JST/view-part/?ref=snap
3V3 5V ESP32 STM32: "LED"
BOOT EN: "Switch Tactile N.O. SPST Round Button Gull Wing 0.05A 12VDC 1.5N SMD T/R", Package=None, Check_prices=https://www.snapeda.com/parts/B3U1000P/Omron/view-part/?ref=eda, MF=Omron, MP=B3U1000P, SnapEDA_Link=https://www.snapeda.com/parts/B3U1000P/Omron/view-part/?ref=snap
C1 C2: library part 0106032200550, "CAP, size 0603, 22 pF, 50 VDC", Capacitance="22 pF", Manufacture Name=TDK, Manufacture SN=CGA3E2NP01H220J080AA, Operating Temperature="-55 to +125degC", Tolerance=+/-5%, Voltage Rating DC="50 VDC", ComponentLink2Description=Datasheet, ComponentLink2URL=https://product.tdk.com/system/files/dam/doc/product/capacitor/ceramic/mlcc/catalog/mlcc_automotive_hightemp_en.pdf?ref_disty=mouser, Mounting Technology=SMT, Packaging="Tape and Reel", Size=0603, Supplier 1 Name=Mouser, Supplier 1 SN=810-CGA3E2NP01H220JA, Supplier 1 URL=https://www.mouser.com/ProductDetail/TDK/CGA3E2NP01H220J080AA?qs=xLDY6iXSiQbIDiPJq57tVA%3D%3D&utm_source=mouser-refine-download&utm_medium=file&utm_campaign=CGA3E2NP01H220J080AA&utm_content=TDK, Supplier 2 Name=Digi-Key, Supplier 2 SN=445-12401-2-ND, Supplier 2 URL=https://www.digikey.com/en/products/detail/tdk-corporation/cga3e2np01h220j080aa/3949637, Supplier 3 Name=thegioiic, Supplier 3 SN=N/A, Supplier 3 URL=N/A
C3 C4 C6 C8 C11 C13 C15 C16 C17 C29 C30 C32 C34 C43: library part 0106031041050, "CAP, size 0603, 100 nF, 50 VDC", Capacitance="100 nF", Manufacture Name=TDK, Manufacture SN=CGA3E3X8R1H104K080AE, Operating Temperature="-55 to +125degC", Tolerance=+/-10%, Voltage Rating DC="50 VDC", ComponentLink2Description=Datasheet, ComponentLink2URL=https://product.tdk.com/system/files/dam/doc/product/capacitor/ceramic/mlcc/catalog/mlcc_automotive_soft_en.pdf?ref_disty=mouser, Mounting Technology=SMT, Packaging="Tape and Reel", Size=0603, Supplier 1 Name=Mouser, Supplier 1 SN=810-CGA3E3X8R1H104KA, Supplier 1 URL=https://www.mouser.com/ProductDetail/TDK/CGA3E3X8R1H104K080AE?qs=nQSIdc08i%252Bd8g3IRRgU2bw%3D%3D&utm_source=mouser-refine-download&utm_medium=file&utm_campaign=CGA3E3X8R1H104K080AE&utm_content=TDK, Supplier 2 Name=Digi-Key, Supplier 2 SN=445-173697-2-ND, Supplier 2 URL=https://www.digikey.com/en/products/detail/tdk-corporation/cga3e3x8r1h104k080ae/5809262, Supplier 3 Name=thegioiic, Supplier 3 SN=N/A, Supplier 3 URL=N/A
C5 C7 C9 C12 C20 C21 C22 C23 C24 C25 C26 C27 C31 C33 C35 C41 C42 C45: library part 0106031051016, "CAP, size 0603, 1 uF, 16 VDC", Capacitance="1 uF", Manufacture Name="Samsung Electro-Mechanics", Manufacture SN=CL10B105KO8NNWC, Operating Temperature="-55 to +125degC", Tolerance=+/-10%, Voltage Rating DC="16 VDC", ComponentLink2Description=Datasheet, ComponentLink2URL=https://www.mouser.vn/datasheet/2/585/Samsung_MLCC_1837944-1929650.pdf, Mounting Technology=SMT, Packaging="Tape and Reel", Size=0603, Supplier 1 Name=Mouser, Supplier 1 SN=187-CL10B105KO8NNWC, Supplier 1 URL=https://www.mouser.vn/ProductDetail/Samsung-Electro-Mechanics/CL10B105KO8NNWC?qs=81r%252BiQLm7BT%252BXtc72qn1ug%3D%3D&utm_source=mouser-refine-download&utm_medium=file&utm_campaign=CL10B105KO8NNWC&utm_content=Samsung-Electro-Mechanics, Supplier 2 Name=Digi-Key, Supplier 2 SN=1276-CL10B105KO8NNWCTR-ND, Supplier 2 URL=https://www.digikey.com/en/products/detail/samsung-electro-mechanics/cl10b105ko8nnwc/16572783, Supplier 3 Name=thegioiic, Supplier 3 SN=N/A, Supplier 3 URL=https://www.thegioiic.com/tu-gom-0603-1uf-16v
C10: library part 0106034751010, "CAP, size 0603, 4.7 uF, 10 VDC", Capacitance="4.7 uF", Manufacture Name="Samsung Electro-Mechanics", Manufacture SN=CL10A475KP8NNWC, Operating Temperature="-55 to +125degC", Tolerance=+/-10%, Voltage Rating DC="10 VDC", ComponentLink2Description=Datasheet, ComponentLink2URL=https://www.mouser.vn/datasheet/2/585/Samsung_MLCC_1837944-1929650.pdf, Mounting Technology=SMT, Packaging="Tape and Reel", Size=0603, Supplier 1 Name=Mouser, Supplier 1 SN=187-CL10A475KP8NNWC, Supplier 1 URL=https://www.mouser.vn/ProductDetail/Samsung-Electro-Mechanics/CL10A475KP8NNWC?qs=81r%252BiQLm7BQyXBb52PEUBA%3D%3D&utm_source=mouser-refine-download&utm_medium=file&utm_campaign=CL10A475KP8NNWC&utm_content=Samsung-Electro-Mechanics, Supplier 2 Name=Digi-Key, Supplier 2 SN=1276-CL10A475KP8NNWCTR-ND, Supplier 2 URL=https://www.digikey.com/en/products/detail/samsung-electro-mechanics/cl10a475kp8nnwc/16572736, Supplier 3 Name=thegioiic, Supplier 3 SN=N/A, Supplier 3 URL=https://www.thegioiic.com/tu-gom-0603-4-7uf-25v
C14 C18: library part 0106031061010, "CAP, size 0603, 10 uF, 10 VDC", Capacitance="10 uF", Manufacture Name="Samsung Electro-Mechanics", Manufacture SN=CL10A106KP8NNWC, Operating Temperature="-55 to +125degC", Tolerance=+/-10%, Voltage Rating DC="10 VDC", ComponentLink2Description=Datasheet, ComponentLink2URL=https://www.mouser.vn/datasheet/2/585/MLCC-1837944.pdf, Mounting Technology=SMT, Packaging="Tape and Reel", Size=0603, Supplier 1 Name=Mouser, Supplier 1 SN=187-CL10A106KP8NNWC, Supplier 1 URL=https://www.mouser.vn/ProductDetail/Samsung-Electro-Mechanics/CL10A106KP8NNWC?qs=xZ%2FP%252Ba9zWqZx8LSX23YqWA%3D%3D&utm_source=mouser-refine-download&utm_medium=file&utm_campaign=CL10A106KP8NNWC&utm_content=Samsung-Electro-Mechanics, Supplier 2 Name=Digi-Key, Supplier 2 SN=1276-CL10A106KP8NNWCTR-ND, Supplier 2 URL=https://www.digikey.com/en/products/detail/samsung-electro-mechanics/cl10a106kp8nnwc/16572907, Supplier 3 Name=thegioiic, Supplier 3 SN=N/A, Supplier 3 URL=https://www.thegioiic.com/tu-gom-0603-10uf-25v
C19: library part 0106031031050, "CAP, size 0603, 10 nF, 50 VDC", Capacitance="10 nF", Manufacture Name=TDK, Manufacture SN=CGA3E2X8R1H103K080AA, Operating Temperature="-55 to +125degC", Tolerance=+/-10%, Voltage Rating DC="50 VDC", ComponentLink2Description=Datasheet, ComponentLink2URL=https://product.tdk.com/system/files/dam/doc/product/capacitor/ceramic/mlcc/catalog/mlcc_automotive_hightemp_en.pdf?ref_disty=mouser, Mounting Technology=SMT, Packaging="Tape and Reel", Size=0603, Supplier 1 Name=Mouser, Supplier 1 SN=810-CGA3E2X8R1H103K, Supplier 1 URL=https://www.mouser.com/ProductDetail/TDK/CGA3E2X8R1H103K080AA?qs=NRhsANhppD89WrzFr8uamw%3D%3D&utm_source=mouser-refine-download&utm_medium=file&utm_campaign=CGA3E2X8R1H103K080AA&utm_content=TDK, Supplier 2 Name=Digi-Key, Supplier 2 SN=445-5892-2-ND, Supplier 2 URL=https://www.digikey.com/en/products/detail/tdk-corporation/cga3e2x8r1h103k080aa/2443370, Supplier 3 Name=thegioiic, Supplier 3 SN=N/A, Supplier 3 URL=N/A
C28: library part 0106031061010, "CAP, size 0603, 10 uF, 16 VDC", Capacitance="10 uF", Manufacture Name="Samsung Electro-Mechanics", Manufacture SN=CL10A106KP8NNWC, Operating Temperature="-55 to +125degC", Tolerance=+/-10%, Voltage Rating DC="16 VDC", ComponentLink2Description=Datasheet, ComponentLink2URL=https://www.mouser.vn/datasheet/2/585/MLCC-1837944.pdf, Mounting Technology=SMT, Packaging="Tape and Reel", Size=0603, Supplier 1 Name=Mouser, Supplier 1 SN=187-CL10A106KP8NNWC, Supplier 1 URL=https://www.mouser.vn/ProductDetail/Samsung-Electro-Mechanics/CL10A106KP8NNWC?qs=xZ%2FP%252Ba9zWqZx8LSX23YqWA%3D%3D&utm_source=mouser-refine-download&utm_medium=file&utm_campaign=CL10A106KP8NNWC&utm_content=Samsung-Electro-Mechanics, Supplier 2 Name=Digi-Key, Supplier 2 SN=1276-CL10A106KP8NNWCTR-ND, Supplier 2 URL=https://www.digikey.com/en/products/detail/samsung-electro-mechanics/cl10a106kp8nnwc/16572907, Supplier 3 Name=thegioiic, Supplier 3 SN=N/A, Supplier 3 URL=https://www.thegioiic.com/tu-gom-0603-10uf-25v
C36 C37 C38 C39 C40 C44: library part 01120610610, "CAP TANT 10uF 10% 16V 1206", Capacitance=10uF, Capacitance Tolerance=+/-10%, Manufacture  Name="KYOCERA AVX", Manufacture  SN=TPSA106K016R1000, Rated Voltage="16 V", ComponentLink1Description="Datasheet link", ComponentLink1URL=https://datasheets.kyocera-avx.com/TAJ.pdf, ComponentLink2Description="Supplier 1 URL", ComponentLink2URL=https://www.mouser.vn/ProductDetail/KYOCERA-AVX/TPSA106K016R1000?qs=GLv2FRWg8zkKT7IxHlCjvQ%3D%3D, ComponentLink3Description="Supplier 2 URL", ComponentLink3URL=https://www.digikey.com/en/products/detail/kyocera-avx/TPSA106K016R1000/7536120, ComponentLink4Description="Supplier 3 URL", ComponentLink4URL=https://www.thegioiic.com/tu-tantalum-10uf-16v-1206-taja106k016rnj, Mounting Technology=SMT, Size=1206, Supplier 1 Name=Mouser, Supplier 1 SN=581-TPSA106K016R1000, Supplier 1 URL=https://www.mouser.vn/ProductDetail/KYOCERA-AVX/TPSA106K016R1000?qs=GLv2FRWg8zkKT7IxHlCjvQ%3D%3D, Supplier 2 Name=Digi-Key, Supplier 2 SN=478-10757-1-ND, Supplier 2 URL=https://www.digikey.com/en/products/detail/kyocera-avx/TPSA106K016R1000/7536120, Supplier 3 Name=thegioiic, Supplier 3 SN=N/A, Supplier 3 URL=https://www.thegioiic.com/tu-tantalum-10uf-16v-1206-taja106k016rnj
CLK: "MICROPHONE -40DB 2VDC", Package=None, Availability=Unavailable, Check_prices=https://www.snapeda.com/parts/POM-2740P-C33-R/PUI+Audio/view-part/?ref=eda, MF="PUI Audio", MP=POM-2740P-C33-R, Price=None, SnapEDA_Link=https://www.snapeda.com/parts/POM-2740P-C33-R/PUI+Audio/view-part/?ref=snap
CS_H: "WR-PHD Socket Header, THT, pitch 2.54mm, Single Row, Vertical, 8p", Contact Resistance=20mOhm, Manufacturer="Wurth Elektronik", Operating Temperature="-40 to +125degC", Rated Current=3A, Withstanding Voltage=500VAC, Working Voltage=250VAC, ComponentLink1Description=Manufacturer, ComponentLink1URL=http://www.we-online.de, ComponentLink2Description=Datasheet, ComponentLink2URL=https://www.we-online.com/catalog/datasheet/61300811821.pdf, ComponentLink3Description="Global Supply", ComponentLink3URL=https://www.we-online.com/en/components/products/PHD_2_54_SOCKET_HEADER_6130XX11821?sq=61300811821#61300811821, ComponentLink4Description="Global Supply", ComponentLink4URL=https://www.mouser.vn/ProductDetail/Wurth-Elektronik/61300811821?qs=ulEaXIWI0c%252BOxrSqc7jVmQ%3D%3D, ComponentLink5Description="Local Supply", ComponentLink5URL=https://www.thegioiic.com/hang-rao-cai-don-2-54mm-8-chan-1-hang-cao-11-8mm-xuyen-lo, Gender="Socket Header", Manufacturer Part Number=61300811821, Mounting Technology=THT, Orientation=Vertical, Packaging=Tray, Pin Number=8, Pitch=2.54mm, Published Date="May 2020", Row Number=Single, Supplier 1 Name=Mouser, Supplier 1 SN=710-61300811821, Supplier 1 URL=https://www.mouser.vn/ProductDetail/Wurth-Elektronik/61300811821?qs=ulEaXIWI0c%252BOxrSqc7jVmQ%3D%3D, Supplier 2 Name=Digi-Key, Supplier 2 SN=N/A, Supplier 2 URL=N/A, Supplier 3 Name=thegioiic, Supplier 3 SN=N/A, Supplier 3 URL=https://www.thegioiic.com/hang-rao-cai-don-2-54mm-8-chan-1-hang-cao-11-8mm-xuyen-lo
CS_V IC1 MOSI_V RST_TFT U5 U7 U9 U10 U11: "Dán", Chung_Loai=Dán, Don_Vi=Con
  CS_V MOSI_V RST_TFT U5 U7 U9 U10 U11: Ma_Hang=MH000672, Ten_Linh_Kien="74HC595D SOP16"
  IC1: Ma_Hang=MH000609, Ten_Linh_Kien="LM358 SOP8"
D3 D4: library part "Diode SS34 ( 1N5822 )", "Dán", Chung_Loai=Dán, Don_Vi=Con, Ma_Hang=MH002104, Ten_Linh_Kien="Diode SS34 3A 40V SMA ( 1N5822 SS34A)"
DIO: "ARM Microcontrollers - MCU 32BIT Cortex M3 64KB 20KB RAM 2X12 ADC", Manufacture SN=STM32F103C8T6TR, Manufacturer=STM, ComponentLink1Description=Datasheet, ComponentLink1URL=https://www.mouser.com/datasheet/2/389/stm32f103c8-1851025.pdf, ComponentLink2Description="Supplier 1 URL", ComponentLink2URL=https://www.mouser.com/ProductDetail/STMicroelectronics/STM32F103C8T6?qs=bhCVus9SdFtq6kqxsU5%2FDA%3D%3D, ComponentLink3Description="Supplier 2 URL", ComponentLink3URL=497-17666-2-ND, ComponentLink4Description="Supplier 3 URL", ComponentLink4URL=https://www.thegioiic.com/stm32f103c8t6-32-bit-arm-cortex-m3-microcontroller-72mhz-64kb-flash-48-lqfp, Footprint name=LQFP48, Pad count=48, Part Number=STM32F103C8T6, Supplier 1 Name=Mouser, Supplier 1 SN=511-STM32F103C8T6, Supplier 1 URL=https://www.mouser.com/ProductDetail/STMicroelectronics/STM32F103C8T6?qs=bhCVus9SdFtq6kqxsU5%2FDA%3D%3D, Supplier 2 Name=Digi-Key, Supplier 2 SN=497-17666-2-ND, Supplier 2 URL=https://www.digikey.com/en/products/detail/stmicroelectronics/stm32f103c8t6tr/2122442, Supplier 3 Name=thegioiic, Supplier 3 SN=STM32F103C8T6, Supplier 3 URL=https://www.thegioiic.com/stm32f103c8t6-32-bit-arm-cortex-m3-microcontroller-72mhz-64kb-flash-48-lqfp
F1: library part 061812250016, "Resettable Fuse, Size 1812, 16V, 2.5A", Hold Current=2.5A, Manufacturer=Bourns, Threshold Current=100A, Threshold Voltage=16V, Trip Current=5A, ComponentLink1Description="Datasheet link", ComponentLink1URL=https://www.bourns.com/docs/Product-Datasheets/mfnsmf.pdf, ComponentLink2Description="Supplier 1 URL", ComponentLink2URL=https://www.mouser.vn/ProductDetail/Bourns/MF-MSMF250-16X-2?qs=9fn1gpisni78zr7pGyDhCQ%3D%3D, ComponentLink3Description="Supplier 2 URL", ComponentLink3URL=https://www.digikey.com/en/products/detail/bourns-inc/MF-MSMF250-16X-2/2563289, ComponentLink4Description="Supplier 3 URL", ComponentLink4URL=https://www.thegioiic.com/mf-msmf250-16-cau-chi-tu-phuc-hoi-1812-16v-2-5a, Mounting Technology=SMT/SMD, Size=1812, Supplier 1 Name=Mouser, Supplier 1 SN=652-MF-MSMF250/16X-2, Supplier 1 URL=https://www.mouser.vn/ProductDetail/Bourns/MF-MSMF250-16X-2?qs=9fn1gpisni78zr7pGyDhCQ%3D%3D, Supplier 2 Name=Digi-Key, Supplier 2 SN=MF-MSMF250/16X-2TR-ND, Supplier 2 URL=https://www.mouser.vn/ProductDetail/Bourns/MF-MSMF250-16X-2?qs=9fn1gpisni78zr7pGyDhCQ%3D%3D, Supplier 3 Name=thegioiic, Supplier 3 SN=MF-MSMF250/16, Supplier 3 URL=https://www.thegioiic.com/mf-msmf250-16-cau-chi-tu-phuc-hoi-1812-16v-2-5a
GND: library part ESP32-WROOM, "Bluetooth, WiFi 802.11b/g/n, Bluetooth v4.2 +EDR, Class 1, 2 and 3 Transceiver Module 2.4GHz ~ 2.5GHz Integrated, Trace Surface Mount", Frequency="2.4GHz ~ 2.5GHz", Mfr="Espressif Systems", Operating Temperature="-40°C ~ 85°C", Power - Output=20dBm, Voltage - Supply="3V ~ 3.6V", Antenna Type="Integrated, Trace", Category="RF and Wireless", ComponentLink1Description=Hshop, ComponentLink1URL=https://hshop.vn/products/mach-thu-phat-wifi-ble-soc-esp32-v1, ComponentLink2Description=Datasheet, ComponentLink2URL=https://www.espressif.com/sites/default/files/russianDocumentation/esp32-wroom-32e_esp32-wroom-32ue_datasheet_en.pdf, Data Rate=150Mbps, Memory Size="4MB Flash, 448kB ROM, 536kB SRAM", Modulation="CCK, DSSS, OFDM", Mounting Type="Surface Mount", Protocol="802.11b/g/n, Bluetooth v4.2 +EDR, Class 1, 2 and 3", RF Family/Standard="Bluetooth, WiFi", Sensitivity=-98dBm, Serial Interfaces="ADC, GPIO, I²C, I²S, PWM, SDIO, SPI, UART", Series=ESP32, Utilized IC / Part=ESP32-D0WD-V3
J13: "Surface Mount，Right Angle DC Power Receptacle 2mm 6.4mm 4A 16V SMD AC/DC Power Connectors ROHS", Package=None, Check_prices=https://www.snapeda.com/parts/PJ-002AH-SMT-TR/Same+Sky/view-part/?ref=eda, MF="Same Sky", MP=PJ-002AH-SMT-TR, SnapEDA_Link=https://www.snapeda.com/parts/PJ-002AH-SMT-TR/Same+Sky/view-part/?ref=snap
JP1: library part "JP 1x4 2.54 Duc Thang", "Cắm", Chung_Loai=Cắm, Don_Vi=Con, Ma_Hang=MH000903, Ten_Linh_Kien="Jump Đơn Đực 2.54MM 1x40P Thẳng 11MM"
MISO_H: library part 629105150521, "Micro USB 2.0 Type B Receptacle WR-COM, Horizontal, SMT, with Pegs, High Current at Pin 1 & Pin 5", Contact Resistance="30 mOhm", Operating Temperature="-40 to 85 degC", Rated Current="3 A", Working Voltage="30 VAC", ComponentLink1Description=Datasheet, ComponentLink1URL=https://katalog.we-online.de/em/datasheet/629105150521.pdf, ComponentLink2Description="Supplier 1 URL", ComponentLink2URL=N/A, ComponentLink3Description="Supplier 2 URL", ComponentLink3URL=N/A, ComponentLink4Description="Supplier 3 URL", ComponentLink4URL=N/A, Connector Type="Micro USB 2.0 Type B", Gender=Receptacle, Mounting Technology=SMT, Orientation=Horizontal, Packaging="Tape and Reel", Part Number=629105150521, Published Date="September 2018", Publisher="Wurth Elektronik", Supplier 1 Name=Mouser, Supplier 1 SN=710-629105150521, Supplier 1 URL=https://www.mouser.vn/ProductDetail/Wurth-Elektronik/629105150521?qs=a9WhcLg8qCzXiH7kZP8GRQ%3D%3D, Supplier 2 Name=Digi-Key, Supplier 2 SN=N/A, Supplier 2 URL=N/A, Supplier 3 Name=thegioiic, Supplier 3 SN=N/A, Supplier 3 URL=N/A
MOSI_H: "17V Clamp 5A (8/20Âµs) Ipp Tvs Diode Surface Mount SOT-23-6", Package="SOT-23-6 STMicroelectronics", Availability="In Stock", Check_prices=https://www.snapeda.com/parts/USBLC6-2SC6/STMicroelectronics/view-part/?ref=eda, MF=STMicroelectronics, MP=USBLC6-2SC6, Price=None, Purchase-URL=https://pricing.snapeda.com/search/part/USBLC6-2SC6/?ref=eda, SnapEDA_Link=https://www.snapeda.com/parts/USBLC6-2SC6/STMicroelectronics/view-part/?ref=snap
Q1 Q2: library part "Trans BC817", "SOT-23 - C8658"
Q3 Q4 Q5 Q6 Q7 Q8 Q9 Q10: "NPN Bipolar Transistor"
R1 R2 R7 R8 R9 R10 R85 R87 R89: library part 0006031031, "RES, size 0603, 10 KOhm, 1/4 W", Manufacture  Name=OEM, Rated Power="1/4 W", Resistance="10 KOhm", Resistance Tolerance=+/-1%, ComponentLink1Description="Datasheet link", ComponentLink1URL=https://fscdn.rohm.com/en/products/databook/datasheet/passive/resistor/chip_resistor/esr-e.pdf, ComponentLink2Description="Supplier 1 URL", ComponentLink2URL=N/A, ComponentLink3Description="Supplier 2 URL", ComponentLink3URL=https://www.digikey.com/en/products/detail/rohm-semiconductor/ESR03EZPF1002/1983429, ComponentLink4Description="Supplier 3 URL", ComponentLink4URL=N/A, Manufacture  SN=OEM, Mounting Technology=SMT, Size=0603, Supplier 1 Name=Mouser, Supplier 1 SN=755-ESR03EZPF1002, Supplier 1 URL=https://www.mouser.vn/ProductDetail/ROHM-Semiconductor/ESR03EZPF1002?qs=sGAEpiMZZMvdGkrng054t67Efho1F8r6CDeAsqwFse8%3D, Supplier 2 Name=Digi-Key, Supplier 2 SN="RHM10KADTR-ND RHM10KADCT-ND RHM10KADDKR-ND", Supplier 2 URL=https://www.digikey.com/en/products/detail/rohm-semiconductor/ESR03EZPF1002/1983429, Supplier 3 Name=thegioiic, Supplier 3 SN=N/A, Supplier 3 URL=N/A
R3 R4: library part 0006035111, "RES, size 0603, 510 Ohm, 1/4 W", Manufacture  Name=OEM, Rated Power="1/4 W", Resistance="510 Ohm", Resistance Tolerance=+/-1%, ComponentLink1Description="Datasheet link", ComponentLink1URL=https://industrial.panasonic.com/cdbs/www-data/pdf/RDN0000/AOA0000C313.pdf, ComponentLink2Description="Supplier 1 URL", ComponentLink2URL=N/A, ComponentLink3Description="Supplier 2 URL", ComponentLink3URL=https://www.digikey.com/en/products/detail/panasonic-electronic-components/ERJ-3BQFR51V/5647434, ComponentLink4Description="Supplier 3 URL", ComponentLink4URL=N/A, Manufacture  SN=OEM, Mounting Technology=SMT, Size=0603, Supplier 1 Name=Mouser, Supplier 1 SN=667-ERJ-UP3F5100V, Supplier 1 URL=https://www.mouser.vn/ProductDetail/Panasonic/ERJ-UP3F5100V?qs=sGAEpiMZZMvdGkrng054twq3eZrCFN89dfK8VohwH1n5T5ZGAc92MQ%3D%3D, Supplier 2 Name=Digi-Key, Supplier 2 SN="P17401TR-ND P17401CT-ND P17401DKR-ND", Supplier 2 URL=https://www.digikey.com/en/products/detail/panasonic-electronic-components/ERJ-3BQFR51V/5647434, Supplier 3 Name=thegioiic, Supplier 3 SN=N/A, Supplier 3 URL=N/A
R5 R6: library part 0006030001, "RES, size 0603, 0 Ohm, 1/4 W", Manufacture  Name=YAGEO, Manufacture  SN=AC0603FR-070RL, Rated Power="1/4 W", Resistance="0 Ohm", Resistance Tolerance=+/-1%, ComponentLink1Description="Datasheet link", ComponentLink1URL=https://www.mouser.com/datasheet/2/447/Yageo_06282023_ACseries-3224032.pdf, ComponentLink2Description="Supplier 1 URL", ComponentLink2URL=N/A, ComponentLink3Description="Supplier 2 URL", ComponentLink3URL=https://www.digikey.com/en/products/detail/yageo/ac0603fr-070rl/2827812, ComponentLink4Description="Supplier 3 URL", ComponentLink4URL=N/A, Mounting Technology=SMT, Size=0603, Supplier 1 Name=Mouser, Supplier 1 SN=603-AC0603FR-070RL, Supplier 1 URL=https://www.mouser.com/ProductDetail/YAGEO/AC0603FR-070RL?qs=sGAEpiMZZMtlubZbdhIBIOG3KwTtqrl%2FD2D%252BGuMCfoY%3D, Supplier 2 Name=Digi-Key, Supplier 2 SN=311-0.0LDTR-ND, Supplier 2 URL=https://www.digikey.com/en/products/detail/yageo/ac0603fr-070rl/2827812, Supplier 3 Name=thegioiic, Supplier 3 SN=N/A, Supplier 3 URL=https://www.thegioiic.com/dien-tro-0-ohm-0603-1-
R11 R28 R31 R46 R51 R64 R71 R82: library part 0006031221, "RES, size 0603, 1.2 KOhm, 1/4 W", Manufacture  Name=OEM, Rated Power="1/4 W", Resistance="1.2 KOhm", Resistance Tolerance=+/-1%, ComponentLink1Description="Datasheet link", ComponentLink1URL=https://api.pim.na.industrial.panasonic.com/file_stream/main/fileversion/4484, ComponentLink2Description="Supplier 1 URL", ComponentLink2URL=N/A, ComponentLink3Description="Supplier 2 URL", ComponentLink3URL=N/A, ComponentLink4Description="Supplier 3 URL", ComponentLink4URL=N/A, Manufacture  SN=OEM, Mounting Technology=SMT, Size=0603, Supplier 1 Name=Mouser, Supplier 1 SN=667-ERJ-UP3F1201V, Supplier 1 URL=https://www.mouser.vn/ProductDetail/Panasonic/ERJ-UP3F1201V?qs=sGAEpiMZZMvdGkrng054twq3eZrCFN895BO3G72d%2F02jECAea43bgQ%3D%3D, Supplier 2 Name=Digi-Key, Supplier 2 SN="10-ERJ-UP3F1201VTR-ND 10-ERJ-UP3F1201VCT-ND 10-ERJ-UP3F1201VDKR-ND", Supplier 2 URL=N/A, Supplier 3 Name=thegioiic, Supplier 3 SN=N/A, Supplier 3 URL=N/A
R12 R13 R14 R15 R16 R17 R18 R19 R20 R21 R22 R23 R25 R26 R27 R29 R30 R32 R33 R34 R35 R36 R37 R38 R39 R40 R41 R42 R43 R44 R45 R47 R48 R49 R50 R52 R53 R54 R55 R56 R57 R58 R59 R60 R61 R62 R63 R65 R66 R67 R68 R69 R70 R72 R73 R74 R75 R76 R77 R78 R79 R80 R81: library part 0006036811, "RES, size 0603, 680 Ohm, 1/4 W", Manufacture  Name=OEM, Rated Power="1/4 W", Resistance="680 Ohm", Resistance Tolerance=+/-1%, ComponentLink1Description="Datasheet link", ComponentLink1URL=https://fscdn.rohm.com/en/products/databook/datasheet/passive/resistor/chip_resistor/esr-e.pdf, ComponentLink2Description="Supplier 1 URL", ComponentLink2URL=N/A, ComponentLink3Description="Supplier 2 URL", ComponentLink3URL=https://www.digikey.com/en/products/detail/rohm-semiconductor/ESR03EZPF6800/4007267, ComponentLink4Description="Supplier 3 URL", ComponentLink4URL=N/A, Manufacture  SN=OEM, Mounting Technology=SMT, Size=0603, Supplier 1 Name=Mouser, Supplier 1 SN=755-ESR03EZPF6800, Supplier 1 URL=https://www.mouser.vn/ProductDetail/ROHM-Semiconductor/ESR03EZPF6800?qs=sGAEpiMZZMvdGkrng054tywGjayRHxH2%252BpGMJaiHRuJd8MneXKUC7g%3D%3D, Supplier 2 Name=Digi-Key, Supplier 2 SN="511-ESR03EZPF6800TR-ND 511-ESR03EZPF6800CT-ND 511-ESR03EZPF6800DKR-ND", Supplier 2 URL=https://www.digikey.com/en/products/detail/rohm-semiconductor/ESR03EZPF6800/4007267, Supplier 3 Name=thegioiic, Supplier 3 SN=N/A, Supplier 3 URL=N/A
R24: library part 0006036811, "RES, size 0603, 680 Ohm, 1/4 W", Manufacture  Name=OEM, Rated Power="1/4 W", Resistance="680 Ohm", ComponentLink1Description="Datasheet link", ComponentLink1URL=https://fscdn.rohm.com/en/products/databook/datasheet/passive/resistor/chip_resistor/esr-e.pdf, ComponentLink2Description="Supplier 1 URL", ComponentLink2URL=N/A, ComponentLink3Description="Supplier 2 URL", ComponentLink3URL=https://www.digikey.com/en/products/detail/rohm-semiconductor/ESR03EZPF6800/4007267, ComponentLink4Description="Supplier 3 URL", ComponentLink4URL=N/A, LATCH=+/-1%, Manufacture  SN=OEM, Mounting Technology=SMT, Size=0603, Supplier 1 Name=Mouser, Supplier 1 SN=755-ESR03EZPF6800, Supplier 1 URL=https://www.mouser.vn/ProductDetail/ROHM-Semiconductor/ESR03EZPF6800?qs=sGAEpiMZZMvdGkrng054tywGjayRHxH2%252BpGMJaiHRuJd8MneXKUC7g%3D%3D, Supplier 2 Name=Digi-Key, Supplier 2 SN="511-ESR03EZPF6800TR-ND 511-ESR03EZPF6800CT-ND 511-ESR03EZPF6800DKR-ND", Supplier 2 URL=https://www.digikey.com/en/products/detail/rohm-semiconductor/ESR03EZPF6800/4007267, Supplier 3 Name=thegioiic, Supplier 3 SN=N/A, Supplier 3 URL=N/A
R83: library part 0006031041, "RES, size 0603, 100 KOhm, 1/4 W", Manufacture  Name=OEM, Rated Power="1/4 W", Resistance="100 KOhm", Resistance Tolerance=+/-1%, ComponentLink1Description="Datasheet link", ComponentLink1URL=https://www.yageo.com/upload/media/product/productsearch/datasheet/rchip/PYu-SR_20105_RoHS_L_10.pdf, ComponentLink2Description="Supplier 1 URL", ComponentLink2URL=N/A, ComponentLink3Description="Supplier 2 URL", ComponentLink3URL=https://www.digikey.com/en/products/detail/yageo/SR0603FR-7T100KL/9373095, ComponentLink4Description="Supplier 3 URL", ComponentLink4URL=N/A, Manufacture  SN=OEM, Mounting Technology=SMT, Size=0603, Supplier 1 Name=Mouser, Supplier 1 SN=603-SR0603FR-7T100KL, Supplier 1 URL=https://www.mouser.vn/ProductDetail/YAGEO/SR0603FR-7T100KL?qs=sGAEpiMZZMvdGkrng054tz1y1XEHv7sNa%252BA%2F4WiDMf7aGw4zRBb%2FFQ%3D%3D, Supplier 2 Name=Digi-Key, Supplier 2 SN="YAG5821TR-ND YAG5821CT-ND YAG5821DKR-ND", Supplier 2 URL=https://www.digikey.com/en/products/detail/yageo/SR0603FR-7T100KL/9373095, Supplier 3 Name=thegioiic, Supplier 3 SN=N/A, Supplier 3 URL=N/A
R84: library part 0006031021, "RES, size 0603, 1 KOhm, 1/4 W", Manufacture  Name=OEM, Rated Power="1/4 W", Resistance="1 KOhm", Resistance Tolerance=+/-1%, ComponentLink1Description="Datasheet link", ComponentLink1URL=https://www.yageo.com/upload/media/product/productsearch/datasheet/rchip/PYu-SR_20105_RoHS_L_10.pdf, ComponentLink2Description="Supplier 1 URL", ComponentLink2URL=N/A, ComponentLink3Description="Supplier 2 URL", ComponentLink3URL=https://www.digikey.com/en/products/detail/yageo/SR0603FR-7T1KL/9373103, ComponentLink4Description="Supplier 3 URL", ComponentLink4URL=N/A, Manufacture  SN=OEM, Mounting Technology=SMT, Size=0603, Supplier 1 Name=Mouser, Supplier 1 SN=71-RCS06031K00FKEA, Supplier 1 URL=https://www.mouser.vn/ProductDetail/Vishay-Dale/RCS06031K00FKEA?qs=sGAEpiMZZMvdGkrng054t9clqp6gtJJdzI9PGMrTQi4RTIuHToNahw%3D%3D, Supplier 2 Name=Digi-Key, Supplier 2 SN="YAG5829TR-ND YAG5829CT-ND YAG5829DKR-ND", Supplier 2 URL=https://www.digikey.com/en/products/detail/yageo/SR0603FR-7T1KL/9373103, Supplier 3 Name=thegioiic, Supplier 3 SN=N/A, Supplier 3 URL=N/A
R86: library part 0006032221, "RES, size 0603, 2.2  KOhm, 1/4 W", Manufacture  Name=OEM, Rated Power="1/4 W", Resistance="2.2  KOhm", Resistance Tolerance=+/-1%, ComponentLink1Description="Datasheet link", ComponentLink1URL=N/A, ComponentLink2Description="Supplier 1 URL", ComponentLink2URL=N/A, ComponentLink3Description="Supplier 2 URL", ComponentLink3URL=https://www.digikey.com/en/products/detail/yageo/RC0603FR-132K2L/13694214, ComponentLink4Description="Supplier 3 URL", ComponentLink4URL=N/A, Manufacture  SN=OEM, Mounting Technology=SMT, Size=0603, Supplier 1 Name=Mouser, Supplier 1 SN=603-SR0603FR-7T2K2L, Supplier 1 URL=https://www.mouser.vn/ProductDetail/YAGEO/SR0603FR-7T2K2L?qs=pfd5qewlna6SQQIuviAJZA%3D%3D, Supplier 2 Name=Digi-Key, Supplier 2 SN=13-RC0603FR-132K2LTR-ND, Supplier 2 URL=https://www.digikey.com/en/products/detail/yageo/RC0603FR-132K2L/13694214, Supplier 3 Name=thegioiic, Supplier 3 SN=N/A, Supplier 3 URL=N/A
R88: library part 0006033011, "RES, size 0603, 300 Ohm, 1/4 W", Manufacture  Name=OEM, Rated Power="1/4 W", Resistance="300 Ohm", Resistance Tolerance=+/-1%, ComponentLink1Description="Datasheet link", ComponentLink1URL=N/A, ComponentLink2Description="Supplier 1 URL", ComponentLink2URL=N/A, ComponentLink3Description="Supplier 2 URL", ComponentLink3URL=https://www.digikey.com/en/products/detail/yageo/RC0603FR-10300RL/14008461, ComponentLink4Description="Supplier 3 URL", ComponentLink4URL=N/A, Manufacture  SN=OEM, Mounting Technology=SMT, Size=0603, Supplier 1 Name=Mouser, Supplier 1 SN=755-SDR03EZPF3000, Supplier 1 URL=https://www.mouser.vn/ProductDetail/ROHM-Semiconductor/SDR03EZPF3000?qs=MyNHzdoqoQKYsGXohuNk8Q%3D%3D, Supplier 2 Name=Digi-Key, Supplier 2 SN=13-RC0603FR-10300RLTR-ND, Supplier 2 URL=https://www.digikey.com/en/products/detail/yageo/RC0603FR-10300RL/14008461, Supplier 3 Name=thegioiic, Supplier 3 SN=N/A, Supplier 3 URL=N/A